# Altium PCB NeoLink Basic Main Board.PcbDoc (part 3 of 5)
Units mm, origin at the board's own origin, x right, y up, seen from the top; angles counter-clockwise.
Board outline 70 x 115 mm, 6 copper layers (Top Layer, Layer 2, Layer 3, Layer 4, Layer 5, Bottom Layer), stack 1.148 mm thick; 467 components, 265 nets, 1397 pads, 1169 vias.
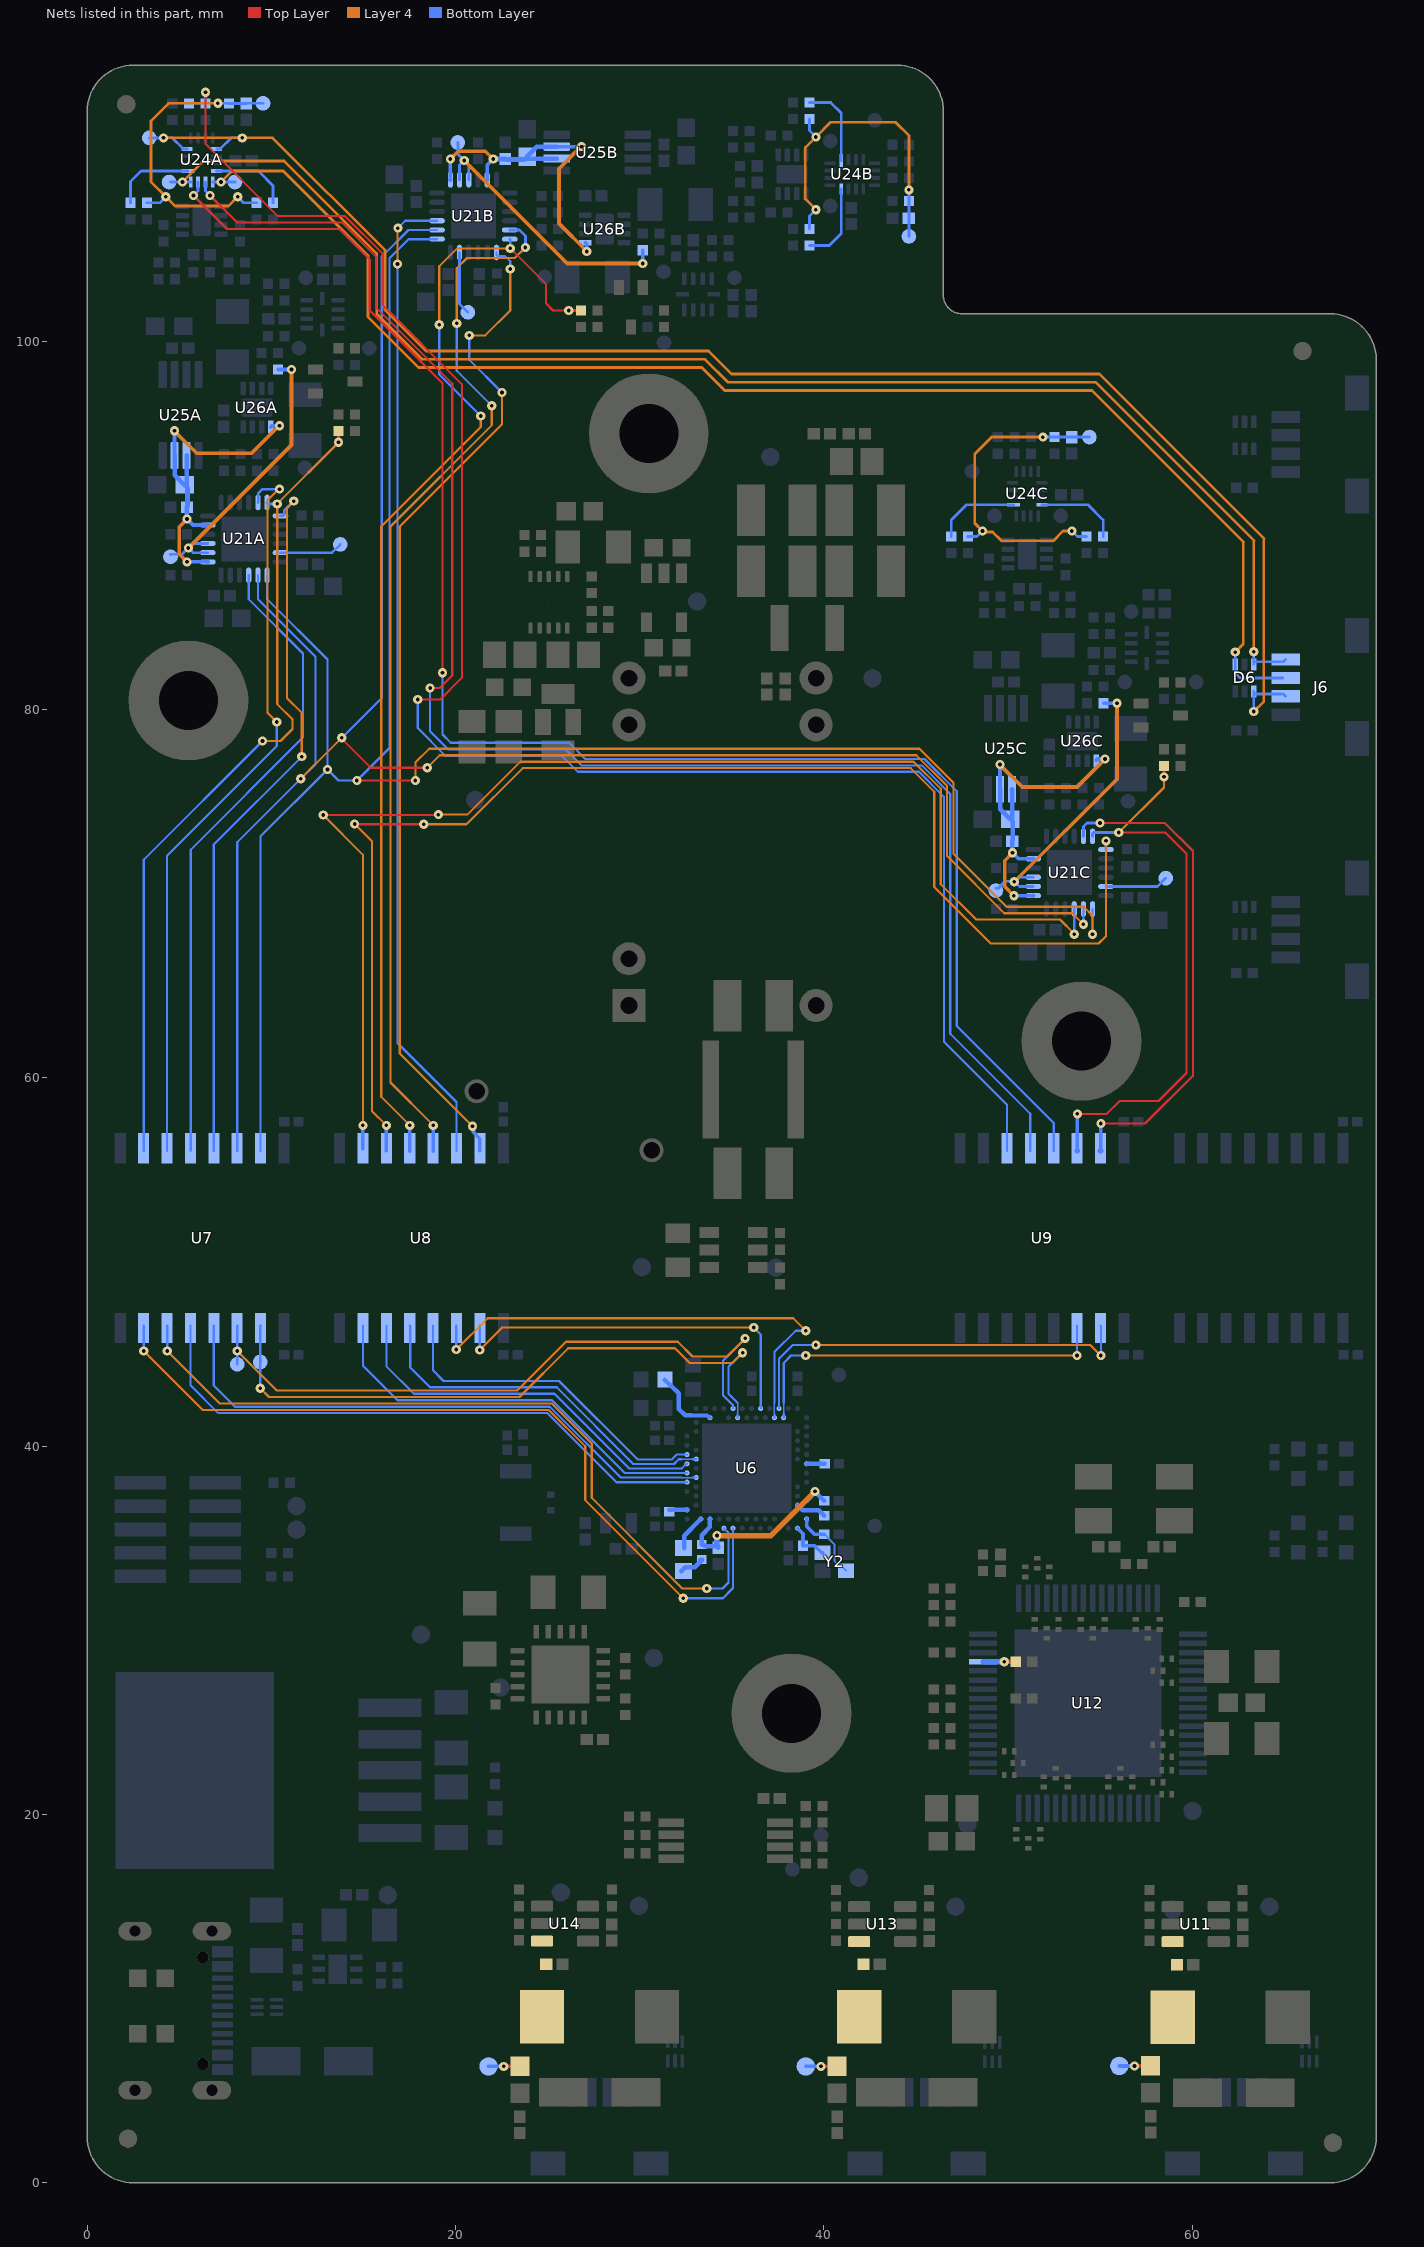
[diagram p6: the nets of this part, all layers, seen from the top]

## Via types
v1: diameter 0.5, hole 0.2, Top Layer to Bottom Layer, tented both sides, 1097 vias
v2: diameter 0.8, hole 0.4, Top Layer to Bottom Layer, tented both sides, 32 vias
v3: diameter 0.5, hole 0.2, Top Layer to Bottom Layer, 24 vias
v4: diameter 0.6, hole 0.3, Top Layer to Bottom Layer, 16 vias

## Nets (pads, with @x,y where several pads share a name; then routed paths per layer and width w, separated by ;. In a path a pad name is that pad's centre, name@x,y a point inside that pad or via, vN(x,y) a via of type N, cw(c..) or ccw(c..) an arc to the next point about the centre after c; other vN are vias at no path point) (continued)
DN4_VBUS: (continued)
  Bottom Layer w0.2: TP22.1@21.8,6.325 v1(22.625,6.325)
ECG_CH1.SW_NEG_ISO: U9.12 U24A.14 | length 90.4
  Top Layer w0.12: v1(6.675,107.925) 8.15,106.45 13.85,106.45 15.7,104.6 15.7,101.825 19.825,97.7 19.825,81.85 19.15,81.175 v1(18.625,81.175)
  Bottom Layer w0.12: v1(18.625,81.175) 18.625,78.825 19.6,77.85 25.975,77.85 26.85,76.975 45.325,76.975 46.875,75.425 46.875,62.4 51.22,58.055 U9.12@51.22,56.05
  Bottom Layer w0.15: U24A.14@6.425,108.65 6.425,108.175 v1(6.675,107.925)
ECG_CH1.SW_POS_ISO: U9.13 U24A.15 | length 90.2
  Top Layer w0.12: v1(5.775,107.925) 7.6,106.1 13.7,106.1 15.35,104.45 15.35,101.675 19.3,97.725 v1(19.3,82)
  Bottom Layer w0.12: v1(19.3,82) 19.3,78.65 19.75,78.2 26.175,78.2 27.05,77.325 45.475,77.325 47.225,75.575 47.225,62.825 52.49,57.56 U9.13@52.49,56.05
  Bottom Layer w0.15: v1(5.775,107.925) 6.025,108.175 U24A.15@6.025,108.65
ECG_CH1.SW_RLD_ISO: R21A.2 R24A.2 U9.11 | length 96.4
  Top Layer w0.12: v1(6.425,113.525) 6.425,110.725 10.35,106.8 14,106.8 16.05,104.75 16.05,101.975 20.35,97.675 20.35,81.725 19.175,80.55 v1(17.95,80.55)
  Bottom Layer w0.12: R21A.2@6.4,112.925 R21A.2@6.425,112.95 ; v1(17.95,80.55) 17.95,79 19.45,77.5 25.775,77.5 26.65,76.625 45.175,76.625 46.525,75.275 46.525,61.975 49.95,58.55 U9.11@49.95,56.05
  Bottom Layer w0.15: R24A.2@5.525,112.925 R21A.2@6.4,112.925 ; R21A.2@6.425,112.95 v1(6.425,113.525)
ECG_CH1_AN_NEGA: R82A.2 U24A.12 | length 4.3
  Bottom Layer w0.15: U24A.12@7.025,109.25 9.3,109.25 10.1,108.45 R82A.2@10.1,107.525
ECG_CH1_AN_NEGB: R82B.2 U24B.12 | length 4.4
  Bottom Layer w0.15: R82B.2@39.225,105.2 40.3,105.2 40.95,105.85 U24B.12@40.95,108.275
ECG_CH1_AN_NEGC: R82C.2 U24C.12 | length 4.6
  Bottom Layer w0.15: U24C.12@51.85,91.125 54.35,91.125 55.175,90.3 R82C.2@55.175,89.4
ECG_CH1_AN_POSA: R72A.2 U24A.1 | length 4.5
  Bottom Layer w0.15: R72A.2@2.35,107.525 2.35,108.675 2.925,109.25 U24A.1@5.475,109.25
ECG_CH1_AN_POSB: R72B.2 U24B.1 | length 4.5
  Bottom Layer w0.15: R72B.2@39.225,112.975 40.375,112.975 40.95,112.4 U24B.1@40.95,109.825
ECG_CH1_AN_POSC: R72C.2 U24C.1 | length 4.6
  Bottom Layer w0.15: R72C.2@46.925,89.4 46.925,90.3 47.75,91.125 U24C.1@50.3,91.125
ECG_CH1_AN_RLDA: C127A.1 R75A.2 R81A.2 R89A.2 TP38A.1 | length 17.5
  Layer 4 w0.15: v1(7.1,112.925) 4.425,112.925 3.475,111.975 3.475,108.65 v1(4.275,107.85) 4.775,107.35 7.675,107.35 v1(8.175,107.85)
  Bottom Layer w0.15: R75A.2@3.25,107.525 3.95,107.525 v1(4.275,107.85) ; v1(7.1,112.925) R89A.2@7.69,112.925 ; R89A.2@7.71,112.915 C127A.1@8.655,112.915 ; v1(8.175,107.85) 8.5,107.525 R81A.2@9.2,107.525 ; C127A.1@8.65,112.915 8.66,112.925 TP38A.1@9.55,112.925
ECG_CH1_AN_RLDB: C127B.1 R75B.2 R81B.2 R89B.2 TP38B.1 | length 17.9
  Layer 4 w0.15: v1(39.575,107.15) 39,107.725 39,110.525 v1(39.575,111.1) 40.375,111.9 43.9,111.9 44.625,111.175 v1(44.625,108.225)
  Bottom Layer w0.15: R81B.2@39.225,106.1 39.225,106.8 v1(39.575,107.15) ; R75B.2@39.225,112.075 39.225,111.45 v1(39.575,111.1) ; TP38B.1@44.625,105.7 R89B.2@44.625,107.625 v1(44.625,108.225)
ECG_CH1_AN_RLDC: C127C.1 R75C.2 R81C.2 R89C.2 TP38C.1 | length 18.9
  Layer 4 w0.15: v1(51.9,94.8) 49.125,94.8 48.2,93.875 48.2,90.125 v1(48.625,89.7) 48.675,89.65 49.175,89.65 49.65,89.175 52.475,89.175 53,89.7 v1(53.475,89.7)
  Bottom Layer w0.15: R75C.2@47.825,89.4 48.325,89.4 v1(48.625,89.7) ; v1(51.9,94.8) R89C.2@52.525,94.8 ; R89C.2@52.5,94.8 TP38C.1@54.425,94.8 ; v1(53.475,89.7) 53.775,89.4 R81C.2@54.275,89.4 ; C127C.1@53.6,94.8 TP38C.1@54.337,94.8
ECG_CH1_CON_NEG: D6.4 J6.2 TP34A.1 U24A.13 | length 77.3
  Layer 4 w0.15: v1(7.275,108.65) 7.875,109.25 10.65,109.25 15.25,104.65 15.25,101.325 18,98.575 33.377,98.575 34.627,97.325 54.575,97.325 62.8,89.1 ; v1(62.35,83.125) 62.775,83.55 62.775,89.1
  Bottom Layer w0.15: U24A.13@6.825,108.65 v1(7.275,108.65) TP34A.1@8.05,108.65 ; v1(62.35,83.125) D6.4@62.35,82.46 62.35,81.975 62.6,81.725 J6.2@64.926,81.725
ECG_CH1_CON_POS: D6.6 J6.1 TP31A.1 U24A.16 | length 78.6
  Layer 4 w0.15: v1(5.175,108.65) 6.325,109.8 10.7,109.8 15.725,104.775 15.725,101.5 18.2,99.025 33.564,99.025 34.814,97.775 54.775,97.775 63.375,89.175 ; v1(63.35,83.15) 63.35,89.175
  Bottom Layer w0.15: TP31A.1@4.525,108.65 v1(5.175,108.65) U24A.16@5.625,108.65 ; D6.6@63.35,82.46 v1(63.35,83.15) ; D6.6@63.355,82.6 J6.1@64.801,82.6 ; J6.1@64.951,82.6 J6.1@65.076,82.725
ECG_CH1_CON_RLD: D6.1 J6.3 TP37A.1 U24A.4 U24A.9 | length 87
  Layer 4 w0.15: v1(4.15,111.05) v1(8.425,111.05) 10.075,111.05 16.175,104.95 16.175,101.7 18.4,99.475 33.75,99.475 35,98.225 54.975,98.225 63.925,89.275 ; v1(63.35,79.9) 63.9,80.45 63.9,89.275
  Bottom Layer w0.15: TP37A.1@3.375,111.025 3.39,111.04 4.14,111.04 v1(4.15,111.05) 4.625,111.05 5.225,110.45 U24A.4@5.45,110.45 ; U24A.9@7.05,110.45 7.225,110.45 7.825,111.05 v1(8.425,111.05) ; v1(63.35,79.9) D6.1@63.35,80.99 ; D6.1@63.35,80.93 D6.1@63.43,80.85 ; D6.1@63.455,80.85 J6.3@64.826,80.85 ; J6.3@64.952,80.85 J6.3@65.076,80.725

## Text inside footprints (layer, text, board x,y; h text height)
J2: Bottom Component Body "PCB EDGE" at 0.1,14.75 h1.2 r270
LABEL1: Top Overlay "Label: 6mm x 20mm" at 6.843,61.804 h1.2